# EAGLE board bare-metal-audio_2026-08-14 (EAGLE 9.7.0)
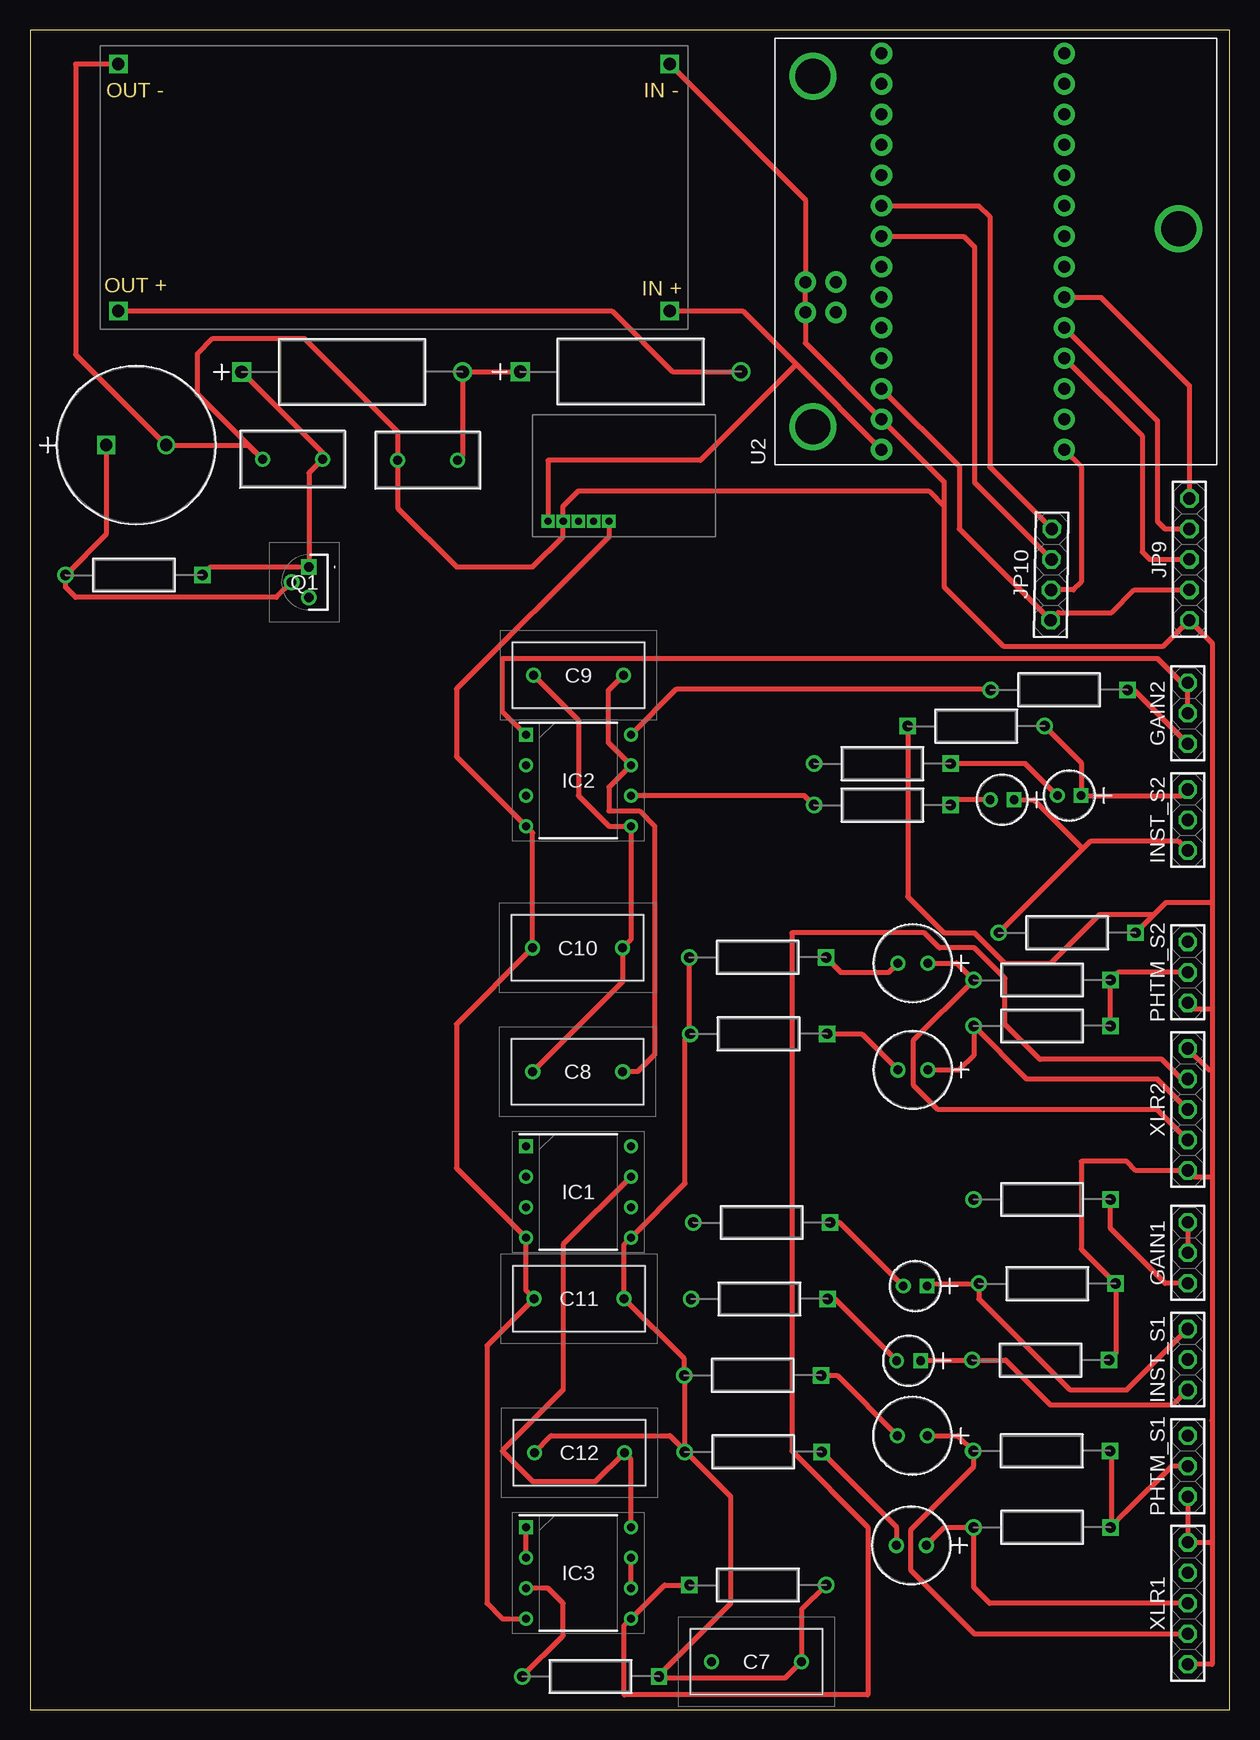
[diagram p0: board, top side]
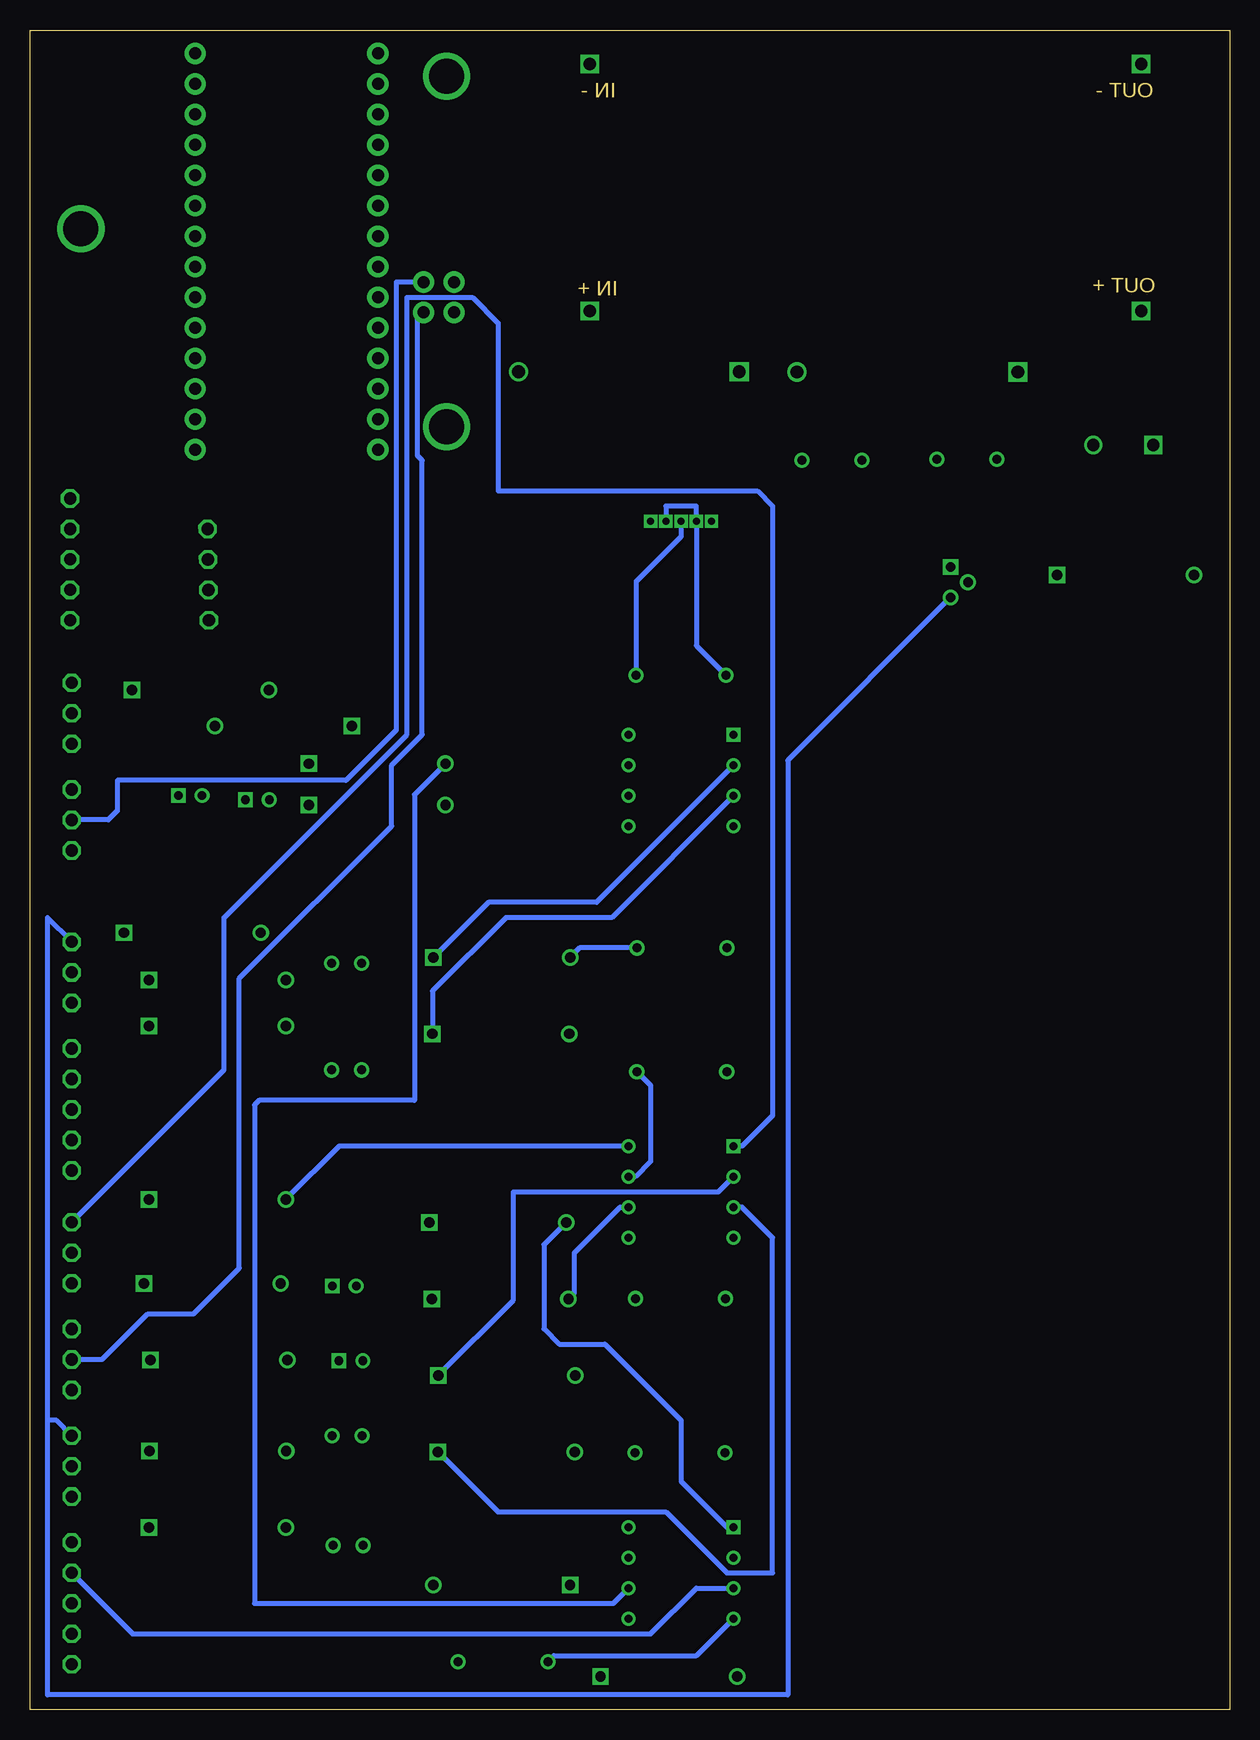
[diagram p1: board, bottom side, seen from below]

Size 100 x 140 mm. Coordinates in mm from the lower left corner, seen from the top.
Outline: 0,0 100,0 100,140 0,140 0,0
Copper layers (1*16): Top / Bottom
Stack-up Default Layer Stack: Top SilkScreen Epoxy Ink / Top SolderMask SR:Green 0.0254mm Dk 4.3 / Top Surface Finish Lead-Free 0.02mm / Top CuFoil:007 0.035mm / Dielectric-1 User Defined 1.5mm / Bottom CuFoil:007 0.035mm / Bottom Surface Finish Lead-Free 0.02mm / Bottom SolderMask SR:Green 0.0254mm Dk 4.3 / Bottom SilkScreen Epoxy Ink
Design rules: minimum drill size 35mil, minimum copper width 6mil, keepout clearance 0mil, drill distance 20mil, via restrict clearance 0mil, solder-mask clearance 0mil, dimension clearance 40mil, restrict clearance 0mil, copper clearance wire_polygon to wire_polygon 16mil, copper clearance wire_polygon to pad_smd 20mil, copper clearance wire_polygon to via 20mil, copper clearance pad_smd to pad_smd 20mil, copper clearance pad_smd to via 20mil, copper clearance via to via 20mil, copper clearance smd to pad (same net) 6mil, copper clearance smd to via (same net) 6mil, copper clearance smd to smd (same net) 6mil

## Footprints (pad centres in the part's own frame; a part is rotated, then mirrored left to right if it is on the bottom)
RES_TYCO_YR1_TYC = drill 0.864 pad 1.372 square: 1 0,0 | drill 0.864 pad 1.372: 2 11.405,0
CAP_EEUFC_125X25_PAN = drill 1.016 pad 1.524 square: 1 0,0 | drill 1.016 pad 1.524: 2 5.004,0
CAP_QYX_4P5X8P5X14_NCH = drill 0.762 pad 1.27: 1 0,0; 2 5,0
QYX2A104JTP = drill 0.75 pad 1.2: 1 0,0; 2 7.5,0
CAP_UEP_6P3X11_NCH = drill 0.762 pad 1.27: 1 0,0; 2 2.5,0
CAP_4_X_7_PAN = drill 0.711 pad 1.219 square: 1 0,0 | drill 0.711 pad 1.219: 2 1.981,0
1X03 = drill 1.016 octagon: 1 -2.54,0; 2 0,0; 3 2.54,0
DIP876W46P254L952H432Q8N = drill 0.66 pad 1.06 square: 1 -4.382,3.81 | drill 0.66 pad 1.06: 2 -4.382,1.27; 3 -4.382,-1.27; 4 -4.382,-3.81; 5 4.382,-3.81; 6 4.382,-1.27; 7 4.382,1.27; 8 4.382,3.81
1X05 = drill 1.016 octagon: 1 -5.08,0; 2 -2.54,0; 3 0,0; 4 2.54,0; 5 5.08,0
1X04 = drill 1.016 octagon: 1 -3.81,0; 2 -1.27,0; 3 1.27,0; 4 3.81,0
IND_B82144A_12X5P2_TDK = drill 1.067 pad 1.575 square: 1 0,0 | drill 1.067 pad 1.575: 2 18.4,0
2N5551 = drill 0.8 pad 1.3 square: 1 0,0 | drill 0.8 pad 1.3: 2 -1.45,-1.27; 3 0,-2.54
MODULE_DEV-15845_ISOLATED = drill 1 pad 1.778: 0 -13.97,-5.08; 1 -11.43,-5.08; 2 -8.89,-5.08; 3 -6.35,-5.08; 3V -11.43,10.16; 4 -3.81,-5.08; 5 -1.27,-5.08; 5V -16.51,10.16; 6 1.27,-5.08; 7 3.81,-5.08; 8 6.35,-5.08; 9 8.89,-5.08; 10 11.43,-5.08; 11 13.97,-5.08; 12 16.51,-5.08; 13 16.51,10.16; 14 13.97,10.16; 15 11.43,10.16; 16 8.89,10.16; 17 6.35,10.16; 18 3.81,10.16; 19 1.27,10.16; 20 -1.27,10.16; 21 -3.81,10.16; 22 -6.35,10.16; 23 -8.89,10.16; G -13.97,10.16; GND -16.51,-5.08; INGND1 -5.08,16.51; INGND2 -2.54,16.51; INL -5.08,13.97; INR -2.54,13.97 | drill 2.921: S1 -14.605,15.875; S2 14.605,15.875; S3 1.905,-14.605
XL6009_FOOT = drill 1.016 square: IN+ 0,20.574; IN- 0,0; OUT+ 45.974,20.574; OUT- 45.974,0
DD1718PA_FOOT = drill 0.6 square: P$1 0,0; P$2 1.27,0; P$3 2.54,0; P$4 3.81,0; P$5 5.08,0

## Placement (x,y rotation side)
1M_1  1M  [RES_TYCO_YR1_TYC]  52.44,2.79 180 top
1M_2  1M  [RES_TYCO_YR1_TYC]  54.97,10.42 0 top
2.2K_1  2.2K  [RES_TYCO_YR1_TYC]  66.51,34.25 180 top
2.2K_2  2.2K  [RES_TYCO_YR1_TYC]  66.7,40.62 180 top
2.2K_3  2.2K  [RES_TYCO_YR1_TYC]  76.76,75.41 180 top
2.2K_4  2.2k  [RES_TYCO_YR1_TYC]  76.76,78.86 180 top
2.2K_5  2.2k  [RES_TYCO_YR1_TYC]  66.37,62.72 180 top
2.2K_6  2.2k  [RES_TYCO_YR1_TYC]  66.44,56.35 180 top
2.2K_7  2.2k  [RES_TYCO_YR1_TYC]  65.96,27.88 180 top
2.2K_8  2.2k  [RES_TYCO_YR1_TYC]  66,21.51 180 top
5.7R_1  5.7R  [RES_TYCO_YR1_TYC]  91.49,85.01 180 top
5.7R_2  5.7R  [RES_TYCO_YR1_TYC]  90.07,42.55 180 top
6.8K_1  6.8K  [RES_TYCO_YR1_TYC]  90.05,21.59 180 top
6.8K_2  6.8K  [RES_TYCO_YR1_TYC]  90.07,15.22 180 top
6.8K_3  6.8K  [RES_TYCO_YR1_TYC]  90.07,60.83 180 top
6.8K_4  6.8K  [RES_TYCO_YR1_TYC]  90.07,57 180 top
100K_1  100K  [RES_TYCO_YR1_TYC]  92.17,64.77 180 top
100K_2  100K  [RES_TYCO_YR1_TYC]  73.18,81.99 0 top
100K_3  100K  [RES_TYCO_YR1_TYC]  90.51,35.53 180 top
100K_4  100K  [RES_TYCO_YR1_TYC]  89.96,29.16 180 top
470R  470R  [RES_TYCO_YR1_TYC]  14.38,94.58 180 top
C1  63V470uF  [CAP_EEUFC_125X25_PAN]  6.35,105.41 0 top
C5  2A473J  [CAP_QYX_4P5X8P5X14_NCH]  19.39,104.22 0 top
C6  2A473J  [CAP_QYX_4P5X8P5X14_NCH]  30.66,104.14 0 top
C7  2A104J  [QYX2A104JTP]  56.82,4.03 0 top
C8  2A104J  [QYX2A104JTP]  49.42,53.2 180 top
C9  2A104J  [QYX2A104JTP]  49.48,86.22 180 top
C10  2A104J  [QYX2A104JTP]  41.91,63.5 0 top
C11  2A104J  [QYX2A104JTP]  49.53,34.29 180 top
C12  2A104J  [QYX2A104JTP]  49.55,21.45 180 top
C13  63V22uF  [CAP_UEP_6P3X11_NCH]  74.82,22.86 180 top
C14  63V22uF  [CAP_UEP_6P3X11_NCH]  74.72,13.72 180 top
C15  63V22uF  [CAP_UEP_6P3X11_NCH]  74.85,62.23 180 top
C16  63V22uF  [CAP_UEP_6P3X11_NCH]  74.85,53.34 180 top
C17  50V4.7uF  [CAP_4_X_7_PAN]  87.63,76.2 180 top
C18  50V4.7uF  [CAP_4_X_7_PAN]  82.04,75.86 180 top
C19  50V4.7uF  [CAP_4_X_7_PAN]  74.79,35.32 180 top
C20  50V4.7uF  [CAP_4_X_7_PAN]  74.24,29.1 180 top
GAIN1  PINHD-1X3  [1X03]  96.52,38.1 90 top
GAIN2  PINHD-1X3  [1X03]  96.52,83.06 90 top
IC1  THAT1512P08-U  [DIP876W46P254L952H432Q8N]  45.72,43.18 0 top
IC2  THAT1512P08-U  [DIP876W46P254L952H432Q8N]  45.72,77.47 0 top
IC3  OPA1642  [DIP876W46P254L952H432Q8N]  45.72,11.43 0 top
INST_S1  PINHD-1X3  [1X03]  96.52,29.21 90 top
INST_S2  PINHD-1X3  [1X03]  96.52,74.17 90 top
JP9  1: GND, 2: VIN, 3: SW, 4:DT, 5:CLK  [1X05]  96.66,95.88 90 top
JP10  1: VIN, 2: GND, 3: CLK, 4: SDA  [1X04]  85.14,94.61 89.2 top
L1  10mH  [IND_B82144A_12X5P2_TDK]  40.87,111.53 0 top
L2  10mH  [IND_B82144A_12X5P2_TDK]  17.65,111.51 0 top
PHTM_S1  PINHD-1X3  [1X03]  96.52,20.32 90 top
PHTM_S2  PINHD-1X3  [1X03]  96.52,61.47 90 top
Q1  2N5551  [2N5551]  23.26,95.25 0 top
U2  DEV-15845MODULE_DEV-15845_ISOLATED  [MODULE_DEV-15845_ISOLATED]  81.15,121.54 90 top
U$1  XL6009_BOOST  [XL6009_FOOT]  53.34,137.16 180 top
U$2  DD1718PA_BOOST  [DD1718PA_FOOT]  43.18,99.06 0 top
XLR1  1,2,3,tip,sleeve  [1X05]  96.52,8.89 90 top
XLR2  1,2,3,tip,sleeve  [1X05]  96.52,50.04 90 top

## Library data of the parts
1M_1 1M_2 2.2K_1-2.2K_8 5.7R_1 5.7R_2 6.8K_1-6.8K_4 100K_1-100K_4 470R = Library_2; COPYRIGHT: Copyright (C) 2026 Ultra Librarian. All rights reserved.; DATASHEET: https://www.te.com/commerce/DocumentDelivery/DDEController?Action=srchrtrv&DocNm=1773265&DocType=Data+Sheet&DocLang=English&PartCntxt=1622796-2&DocFormat=pdf; DESCRIPTION: YR1 0.1% 100R; MANUFACTURER_NAME: TE Connectivity; MANUFACTURER_PART_NUMBER: YR1B100RCC
C1 = Library_2; COPYRIGHT: Copyright (C) 2026 Ultra Librarian. All rights reserved.; MANUFACTURER_NAME: Panasonic; MANUFACTURER_PART_NUMBER: EEUFR1J471
C5 C6 = Library_2; COPYRIGHT: Copyright (C) 2026 Ultra Librarian. All rights reserved.; MANUFACTURER_NAME: Nichicon; MANUFACTURER_PART_NUMBER: QYX2A473JTP
C7-C12 = Library_2; DESCRIPTION: Film Capacitors 100V 0.1uF 10%; HEIGHT: 14mm; MANUFACTURER_NAME: Nichicon; MANUFACTURER_PART_NUMBER: QYX2A104JTP; MOUSER_PART_NUMBER: 647-QYX2A104JTP; MOUSER_PRICE-STOCK: https://www.mouser.co.uk/ProductDetail/Nichicon/QYX2A104JTP?qs=p6VZ%252BklCkRS64fCWFBuy1A%3D%3D
C13-C16 = Library_2; COPYRIGHT: Copyright (C) 2026 Ultra Librarian. All rights reserved.; MANUFACTURER_NAME: Nichicon; MANUFACTURER_PART_NUMBER: UPW1J220MED1TD
C17-C20 = Library_2; COPYRIGHT: Copyright (C) 2026 Ultra Librarian. All rights reserved.; MANUFACTURER_NAME: Panasonic; MANUFACTURER_PART_NUMBER: EEAGA1H4R7
GAIN1 GAIN2 INST_S1 INST_S2 PHTM_S1 PHTM_S2 = Connector; CATEGORY_L1: Connectors; CATEGORY_L2: Headers; CATEGORY_L3: Male Pins; DESCRIPTION: Header-Straight-3 Position; PACKAGE: Through Hole; PITCH: 0.100" (2.54mm)
IC1 IC2 = THAT_LIBRARY; DESCRIPTION: THAT CORPORATION - THAT1512P08-U - IC, PRE-AMP, MICROPHONE, DIP8; HEIGHT: 4.32mm; MANUFACTURER_NAME: THAT CORPORATION; MANUFACTURER_PART_NUMBER: THAT1512P08-U
IC3 = THAT_LIBRARY_2; DESCRIPTION: THAT CORPORATION - THAT1512P08-U - IC, PRE-AMP, MICROPHONE, DIP8; HEIGHT: 4.32mm; MANUFACTURER_NAME: THAT CORPORATION; MANUFACTURER_PART_NUMBER: THAT1512P08-U
JP9 XLR1 XLR2 = Connector; CATEGORY_L1: Connectors; CATEGORY_L2: Headers; CATEGORY_L3: Male Pins; DESCRIPTION: Header-Straight-5 Position; PACKAGE: Through Hole; PITCH: 0.100" (2.54mm)
JP10 = Connector; CATEGORY_L1: Connectors; CATEGORY_L2: Headers; CATEGORY_L3: Male Pins; DESCRIPTION: Header-Straight-4 Position; PACKAGE: Through Hole; PITCH: 0.100" (2.54mm)
L1 L2 = Library_2; COPYRIGHT: Copyright (C) 2026 Ultra Librarian. All rights reserved.; MANUFACTURER_NAME: TDK; MANUFACTURER_PART_NUMBER: B82144A2105J000
Q1 = Library_2; DESCRIPTION: NPN high-voltage transistors 300 mA,160 V,50 nA,30 pF, 300 MHz 65 +150 C; HEIGHT: 7.7mm; MANUFACTURER_NAME: NXP; MANUFACTURER_PART_NUMBER: 2N5551; MOUSER_PART_NUMBER: 771-2N5551; MOUSER_PRICE-STOCK: https://www.mouser.co.uk/ProductDetail/NXP-Semiconductors/2N5551?qs=JTOGeJziEKH4RymgOB83JA%3D%3D
U2 = DEV-15845_updated
U$1 U$2 = Library

## Nets
N$1: U2.5V U$1.IN+ U$2.P$1
N$2: 6.8K_1.2 C13.1 XLR1.2
N$4: 1M_1.1 1M_2.2 2.2K_5.2 2.2K_6.2 2.2K_7.2 2.2K_8.2 100K_1.1 100K_2.1 100K_3.1 100K_4.1 C1.2 C5.1 C6.1 C7.2 C8.2 C9.2 C10.2 C11.1 C12.2 IC1.5 IC2.5 JP9.1 PHTM_S1.1 PHTM_S2.1 U2.G U2.INGND1 U2.INGND2 U$1.IN- U$1.OUT- U$2.P$2 U$2.P$4 XLR1.1 XLR1.5 XLR2.1 XLR2.5
N$5: JP10.4 U2.18
N$6: JP9.3 U2.2
N$7: JP9.4 U2.3
N$8: JP9.5 U2.4
N$9: L1.2 U$1.OUT+
N$10: C6.2 L1.1 L2.2
N$11: 470R.1 C5.2 L2.1 Q1.1
N$12: 470R.2 C1.1 Q1.2
N$13: PHTM_S1.3 PHTM_S2.3 Q1.3
N$14: 6.8K_1.1 6.8K_2.1 PHTM_S1.2
N$15: 6.8K_3.1 6.8K_4.1 PHTM_S2.2
N$16: 6.8K_3.2 C15.1 XLR2.2
N$17: 6.8K_4.2 C16.1 XLR2.3
N$18: 2.2K_6.1 C16.2 IC2.3
N$19: 2.2K_5.1 C15.2 IC2.2
N$20: GAIN1.2 GAIN1.3 IC1.1
N$21: 6.8K_2.2 C14.1 XLR1.3
N$22: 2.2K_7.1 C13.2 IC1.2
N$23: 2.2K_8.1 C14.2 IC1.3
N$24: 100K_1.2 C18.1 INST_S2.1
N$25: 5.7R_2.1 GAIN1.1
N$26: 5.7R_1.1 GAIN2.1
N$27: GAIN2.2 GAIN2.3 IC2.1
N$28: 5.7R_1.2 IC2.8
N$29: 5.7R_2.2 IC1.8
N$30: C8.1 C9.1 C12.1 IC1.7 IC2.7 IC3.8 U$2.P$3
N$31: C7.1 C10.1 C11.2 IC1.4 IC2.4 IC3.4 U$2.P$5
N$32: 2.2K_1.2 IC1.6
N$33: 2.2K_1.1 C20.2
N$34: 100K_4.2 C20.1 INST_S1.1
N$35: 100K_3.2 C19.1 INST_S1.3
N$36: 2.2K_2.1 C19.2
N$37: 2.2K_4.2 IC3.6 IC3.7
N$38: 100K_2.2 C17.1 INST_S2.3
N$39: 2.2K_4.1 C17.2
N$40: 2.2K_3.1 C18.2
N$41: 2.2K_3.2 IC2.6
N$43: 2.2K_2.2 IC3.1 IC3.2
N$44: 1M_1.2 IC3.3 XLR1.4
N$45: 1M_2.1 IC3.5 XLR2.4
N$46: INST_S2.2 U2.INR
N$47: INST_S1.2 U2.INL
N$48: JP10.2 U2.GND
N$49: JP10.3 U2.19
VOL_3.3V: JP9.2 JP10.1 U2.3V

## Tracks (layer width: path | path; a pad name or v marks a point on that pad's centre or on a via)
N$1
  Top 0.406: U$1.IN+ 59.44,116.59 63.88,112.14 | 63.88,112.14 U2.5V | 63.88,112.14 55.88,104.14 43.18,104.14 U$2.P$1
N$2
  Top 0.406: XLR1.2 78.74,6.35 73.41,11.68 73.41,14.99 78.64,20.22 6.8K_1.2 77.37,22.86 C13.1
N$4
  Top 0.406: U$1.OUT- 3.81,137.16 3.81,112.95 C1.2 18.2,105.41 C5.1 13.97,109.64 13.97,113.03 15.24,114.3 22.86,114.3 30.66,106.5 C6.1 30.66,100.16 35.56,95.25 41.91,95.25 44.45,97.79 U$2.P$2 44.45,100.33 45.72,101.6 74.93,101.6 76.2,100.33 | U$1.IN- 64.64,125.86 U2.INGND2 U2.INGND1 64.64,113.92 U2.G 76.2,102.36 76.2,100.33 | C9.2 45.72,82.48 45.72,76.2 48.26,73.66 IC2.5 50.1,64.19 C10.2 49.41,60.7 C8.2 | 76.2,100.33 76.2,93.6 81.15,88.65 94.5,88.65 JP9.1 98.55,88.91 98.55,67.31 | 98.55,67.31 98.55,58.42 | 98.55,58.42 98.55,53.34 | 98.55,53.34 98.55,44.45 | 98.55,44.45 98.55,24.13 98.55,13.97 | 98.55,13.97 98.55,3.81 XLR1.1 | 98.55,13.97 XLR1.5 PHTM_S1.1 | 100K_4.1 90.51,29.71 100K_3.1 87.63,38.4 87.63,45.72 91.44,45.72 92.2,44.96 XLR2.1 97.03,44.45 98.55,44.45 | XLR2.5 98.3,53.34 98.55,53.34 | 100K_1.1 93.71,66.31 | 93.71,66.31 94.71,67.31 98.55,67.31 | 1M_2.2 64.32,8.36 C7.2 62.96,2.67 52.57,2.67 1M_1.1 52.44,2.91 58.42,8.89 58.42,17.78 54.69,21.51 | 54.69,21.51 2.2K_8.2 54.59,27.84 2.2K_7.2 54.56,29.26 C11.1 49.53,38.8 IC1.5 54.61,43.88 54.61,55.92 2.2K_6.2 54.96,56.43 2.2K_5.2 | C12.2 43.46,22.86 53.34,22.86 54.69,21.51 | 100K_2.1 73.18,67.79 76.2,64.77 78.74,64.77 81.28,62.23 85.09,62.23 89.17,66.31 93.71,66.31 | PHTM_S2.1 97.03,58.42 98.55,58.42
  Bottom 0.406: C10.2 54.18,63.5 2.2K_5.2 | C9.2 44.45,88.7 U$2.P$2 44.45,100.33 46.99,100.33 U$2.P$4
N$5
  Top 0.406: U2.18 79.12,125.35 80.01,124.46 80.01,103.6 JP10.4
N$6
  Top 0.406: U2.2 92.71,106.17 92.71,96.52 93.35,95.88 JP9.3
N$7
  Top 0.406: U2.3 93.98,107.44 93.98,99.06 94.62,98.42 JP9.4
N$8
  Top 0.406: U2.4 89.28,117.73 96.66,110.36 JP9.5
N$9
  Top 0.406: U$1.OUT+ 48.51,116.59 53.57,111.53 L1.2
N$10
  Top 0.406: L1.1 36.08,111.53 L2.2 36.05,104.54 C6.2
N$11
  Top 0.406: L2.1 24.39,104.77 C5.2 23.26,103.09 Q1.1 15.04,95.25 470R.1
N$12
  Top 0.406: C1.1 6.35,97.96 470R.2 2.97,93.55 3.81,92.71 20.54,92.71 Q1.2
N$13
  Bottom 0.406: 98.55,24.13 98.55,66.04 PHTM_S2.3 | 98.55,24.13 98.55,1.27 36.83,1.27 36.83,79.14 Q1.3 | PHTM_S1.3 97.79,24.13 98.55,24.13
N$14
  Top 0.406: 6.8K_2.1 90.13,15.28 | 90.13,15.28 91.37,16.51 95.18,20.32 PHTM_S1.2 | 6.8K_1.1 90.13,21.5 90.13,15.28
N$15
  Top 0.406: 6.8K_4.1 6.8K_3.1 90.71,61.47 PHTM_S2.2
N$16
  Top 0.406: C15.1 77.27,62.23 6.8K_3.2 73.66,55.83 73.66,52.07 75.69,50.04 93.98,50.04 XLR2.2
N$17
  Top 0.406: C16.1 77.47,53.34 78.67,54.54 6.8K_4.2 83.09,52.58 93.98,52.58 XLR2.3
N$18
  Top 0.406: 2.2K_6.1 69.34,56.35 C16.2
  Bottom 0.406: IC2.3 51.5,66.04 60.33,66.04 66.44,59.92 2.2K_6.1
N$19
  Top 0.406: 2.2K_5.1 67.64,61.45 71.57,61.45 C15.2
  Bottom 0.406: IC2.2 52.77,67.31 61.78,67.31 2.2K_5.1
N$20
  Top 0.406: GAIN1.3 GAIN1.2
  Bottom 0.406: GAIN1.3 83.82,53.34 83.82,66.04 68.58,81.28 68.58,117.73 63.12,117.73 60.96,115.57 60.96,101.6 39.37,101.6 38.1,100.33 38.1,49.53 40.64,46.99 IC1.1
N$21
  Top 0.406: XLR1.3 80.01,8.89 78.67,10.23 6.8K_2.2 76.22,15.22 C14.1
N$22
  Top 0.406: 2.2K_7.1 67.3,27.88 C13.2
  Bottom 0.406: 2.2K_7.1 59.69,34.15 59.69,43.18 42.61,43.18 IC1.2
N$23
  Top 0.406: 2.2K_8.1 72.22,15.29 C14.2
  Bottom 0.406: 2.2K_8.1 61,16.51 46.99,16.51 41.91,11.43 38.1,11.43 38.1,39.37 40.64,41.91 IC1.3
N$24
  Top 0.406: C18.1 83.69,75.86 87.77,71.78 100K_1.2 88.39,72.39 95.76,72.39 INST_S2.1
N$25
  Top 0.406: GAIN1.1 94.64,35.56 90.07,40.13 5.7R_2.1
N$26
  Top 0.406: GAIN2.1 92.03,85.01 5.7R_1.1
N$27
  Top 0.406: GAIN2.2 96.52,85.09 | 96.52,85.09 GAIN2.3 96.01,85.6 | IC2.1 39.37,83.25 39.37,87.63 93.98,87.63 96.01,85.6 | 96.01,85.6 96.52,85.09
N$28
  Top 0.406: IC2.8 53.91,85.09 80,85.09 5.7R_1.2
N$29
  Bottom 0.406: IC1.8 74.22,46.99 5.7R_2.2
N$30
  Top 0.406: IC3.8 50.1,20.9 C12.1 47.15,19.05 41.91,19.05 39.37,21.59 44.45,26.67 44.45,38.8 IC1.7 | C9.1 48.21,84.95 48.21,80.64 IC2.7 48.26,76.9 48.26,74.93 50.8,74.93 52.07,73.66 52.07,54.61 50.66,53.2 C8.1
  Bottom 0.406: U$2.P$3 45.72,97.79 49.48,94.03 C9.1 | C8.1 48.26,52.05 48.26,45.72 49.53,44.45 IC1.7
N$31
  Top 0.406: U$2.P$5 48.26,97.79 35.56,85.09 35.56,79.44 IC2.4 41.91,73.09 C10.1 35.56,57.15 35.56,45.15 IC1.4 41.34,34.98 C11.2 38.1,30.36 38.1,8.89 39.37,7.62 IC3.4
  Bottom 0.406: IC3.4 44.42,4.54 56.31,4.54 C7.1
N$32
  Bottom 0.406: IC1.6 50.8,41.91 54.61,38.1 54.61,34.75 2.2K_1.2
N$33
  Top 0.406: 2.2K_1.1 67.11,34.25 C20.2
N$34
  Top 0.406: C20.1 74.29,29.16 100K_4.2 81.33,29.16 85.09,25.4 95.25,25.4 INST_S1.1
N$35
  Top 0.406: C19.1 74.99,35.53 100K_3.2 79.1,34.26 86.69,26.67 91.44,26.67 INST_S1.3
N$36
  Top 0.406: 2.2K_2.1 67.51,40.62 C19.2
N$37
  Top 0.406: IC3.6 IC3.7
  Bottom 0.406: 2.2K_4.2 67.94,76.27 67.94,50.8 80.9,50.8 81.28,50.42 81.28,8.89 51.37,8.89 IC3.6
N$38
  Top 0.406: 100K_2.2 87.63,78.94 C17.1 96.01,76.2 INST_S2.3
N$39
  Top 0.406: C17.2 82.99,78.86 2.2K_4.1
N$40
  Top 0.406: C18.2 77.21,75.86 2.2K_3.1
N$41
  Top 0.406: 2.2K_3.2 64.57,76.2 IC2.6
N$43
  Top 0.406: IC3.2 IC3.1
  Bottom 0.406: 2.2K_2.2 57.15,38.77 57.15,31.75 55.88,30.48 52.07,30.48 45.72,24.13 45.72,19.05 41.91,15.24 IC3.1
N$44
  Top 0.406: 1M_1.2 44.45,6.21 44.45,8.89 43.18,10.16 IC3.3
  Bottom 0.406: XLR1.4 91.44,6.35 48.26,6.35 44.45,10.16 IC3.3
N$45
  Top 0.406: 1M_2.1 52.9,10.42 IC3.5 49.53,7.05 49.53,1.27 69.85,1.27 69.85,15.24 63.5,21.59 63.5,64.77 74.55,64.77 75.82,63.5 78.74,63.5 81.28,60.96 81.28,57.15 84.2,54.23 94.36,54.23 96.01,52.58 XLR2.4
N$46
  Bottom 0.406: U2.INR 69.47,119 69.47,81.66 73.66,77.47 92.71,77.47 92.71,74.93 93.47,74.17 INST_S2.2
N$47
  Bottom 0.406: INST_S1.2 93.98,29.21 90.17,33.02 86.36,33.02 82.55,36.83 82.55,60.96 69.85,73.66 69.85,78.74 67.31,81.28 67.31,104.14 67.69,104.52 67.69,115.95 U2.INL
N$48
  Top 0.406: U2.GND 87.63,103.63 87.63,93.98 86.99,93.34 JP10.2
N$49
  Top 0.406: U2.19 77.85,122.81 78.74,121.92 78.74,102.3 JP10.3
VOL_3.3V
  Top 0.406: U2.3V 77.47,103.63 77.47,98.42 JP10.1 85.73,91.44 90.17,91.44 92.07,93.34 JP9.2